# Altium PCB EMG-Arm-ELEC-V2.0.PcbDoc (part 2 of 5)
Units mil, origin at the board's own origin, x right, y up, seen from the top; angles counter-clockwise.
Board outline 8303.83 x 7532.25 mil, 2 copper layers (Top Layer, Bottom Layer), stack 3.556 mil thick; 263 components, 174 nets, 696 pads, 313 vias.
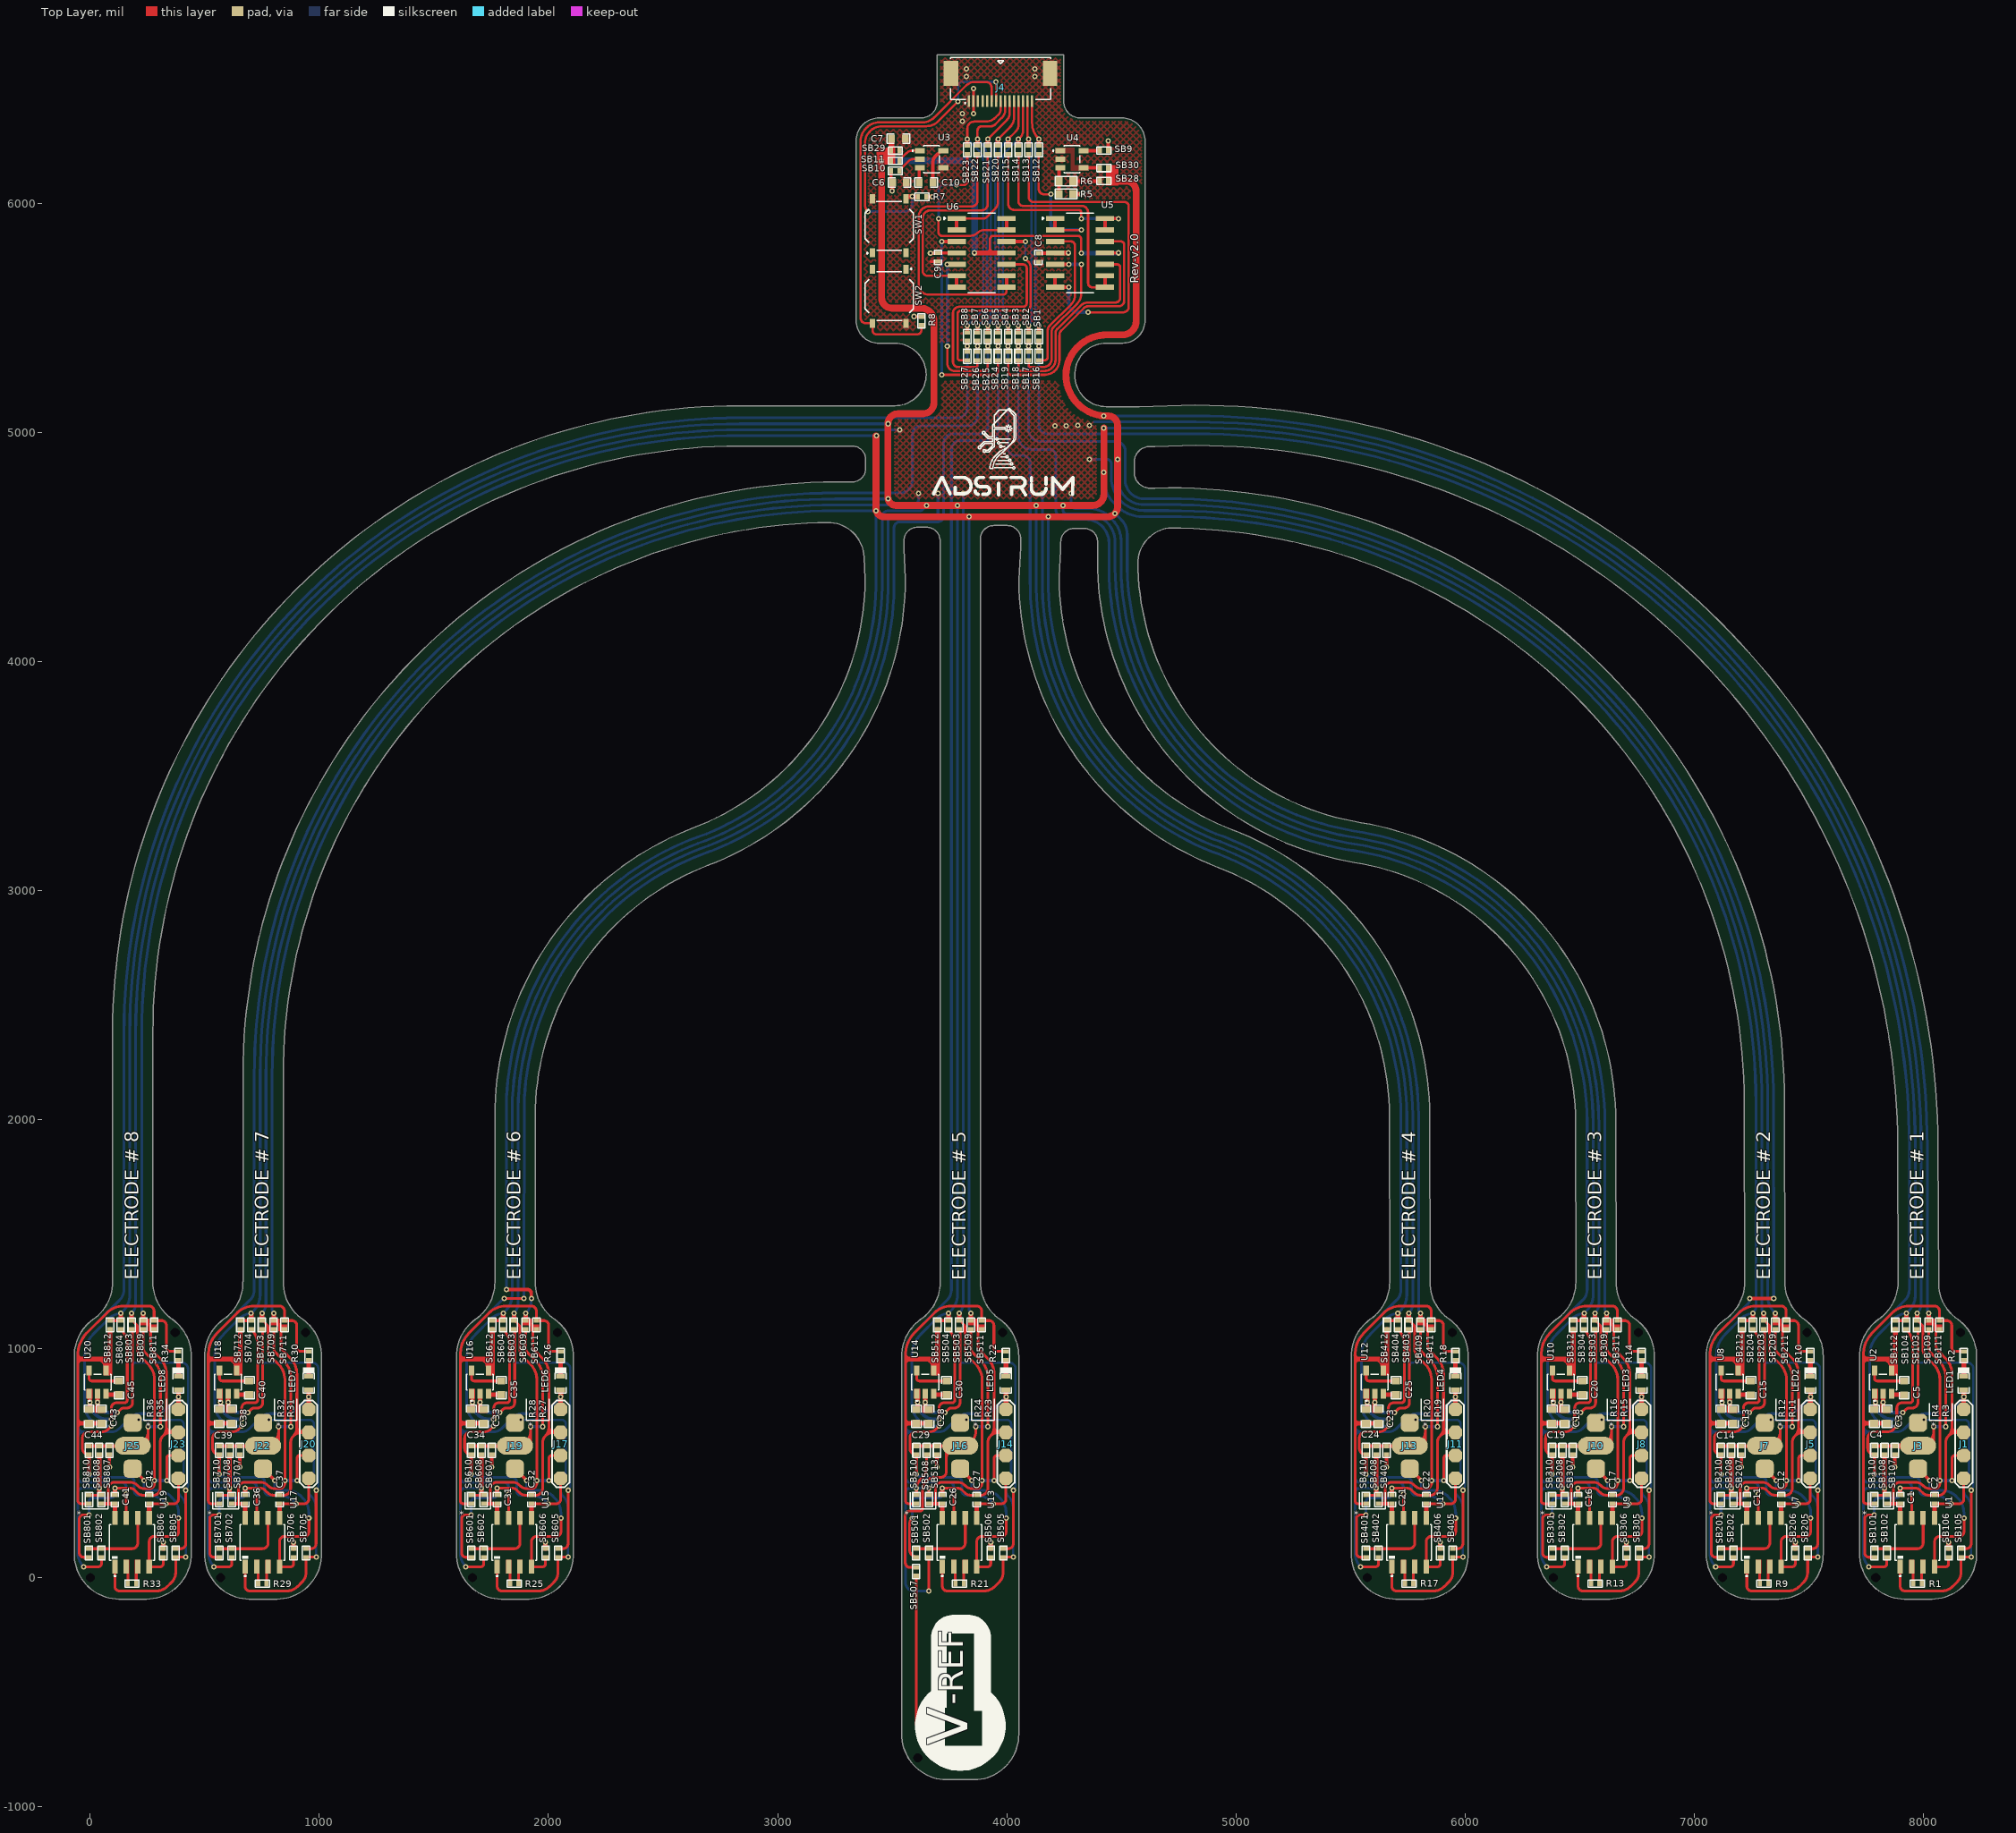
[diagram p0: Top Layer view]

## Part data (continued)
U5 U6: "IC OPAMP GP 1.3MHZ 14SO", Case/Package=SO, Dual Supply Voltage=12V, Input Bias Current=150nA, Input Offset Voltage (Vos)=7mV, Input Voltage Noise Density="40nV/sqrt Hz", LCSC Part Number=C71035, Manufacturer=STMicroelectronics, Max Dual Supply Voltage=15V, Max Operating Temperature=70°C, Max Power Dissipation=400mW, Max Supply Voltage=30V, Min Dual Supply Voltage=1.5V, Min Operating Temperature=0°C, Min Supply Voltage=3V, Nominal Supply Current=1.2mA, Output Current=40mA, Package Quantity=2500, Voltage Gain=100dB, Bandwidth=1.3MHz, Common Mode Rejection Ratio=70dB, ComponentLink1Description=https://datasheet.ciiva.com/4758/cd00000457-103203-4758032.pdf?src-supplier=Mouser, ComponentLink1URL=https://datasheet.ciiva.com/4758/cd00000457-103203-4758032.pdf?src-supplier=Mouser, ComponentLink2Description=https://datasheet.ciiva.com/8008/1834360-8008827.pdf?src-supplier=Element14, ComponentLink2URL=https://datasheet.ciiva.com/8008/1834360-8008827.pdf?src-supplier=Element14, ComponentLink3Description=https://datasheet.ciiva.com/8008/1834360-8008490.pdf?src-supplier=Element14, ComponentLink3URL=https://datasheet.ciiva.com/8008/1834360-8008490.pdf?src-supplier=Element14, ComponentLink4Description=https://datasheet.ciiva.com/28630/1834360-28630538.pdf?src-supplier=Element14, ComponentLink4URL=https://datasheet.ciiva.com/28630/1834360-28630538.pdf?src-supplier=Element14, ComponentLink5Description=https://datasheet.ciiva.com/1795/cd00000457-1795560.pdf?src-supplier=Digi-Key, ComponentLink5URL=https://datasheet.ciiva.com/1795/cd00000457-1795560.pdf?src-supplier=Digi-Key, ComponentLink6Description=https://datasheet.ciiva.com/1795/cd00000457-1795559.pdf?src-supplier=Digi-Key, ComponentLink6URL=https://datasheet.ciiva.com/1795/cd00000457-1795559.pdf?src-supplier=Digi-Key, ComponentLink7Description=https://datasheet.ciiva.com/1795/cd00000457-1795561.pdf?src-supplier=Digi-Key, ComponentLink7URL=https://datasheet.ciiva.com/1795/cd00000457-1795561.pdf?src-supplier=Digi-Key, ComponentLink8Description=https://datasheet.ciiva.com/16375/cd00000457-16375528.pdf?src-supplier=Future+Electronics, ComponentLink8URL=https://datasheet.ciiva.com/16375/cd00000457-16375528.pdf?src-supplier=Future+Electronics, Contact Plating=Tin,Matte, Gain Bandwidth Product=1.3MHz, Height=1.65mm, Item Type=IC, Lead Free="Lead Free", Manufacturer Part Number=LM324DT, Mount="Surface Mount", Number of Amplifiers=4, Number of Channels=4, Number of Circuits=4, Number of Elements=4, Number of Pins=14, Operating Supply Current=1.2mA, Operating Supply Voltage=15V, Output Current per Channel=40mA, Packaging="Cut Tape", Pricing 1="2500=0.18900 (USD)", Radiation Hardening=No, REACH SVHC="No SVHC", RoHS=Yes, RoHS Compliant=Yes, Series=LM324, Slew Rate=0.4V/µs, Stock 1=287500, Supplier 1="Arrow Electronics", Supplier Part Number 1=LM324DT, Supply Type=Single,Dual, Technology=BIPOLAR, Unity Gain Bandwidth Product=1.3MHz, Weight=0.009143oz, Width=4mm

## Free pads (board coordinates)
  round 0 hole 39.37 unplated: MH1(0,0) MH1(568.98,0) MH1(1668.76,0) MH1(3612.24,-788.41) MH1(5574.41,0) MH1(6387.12,-0.01) MH1(7123.87,0) MH1(7793.35,0) MH2(370.49,1069.27) MH2(939.47,1069.27) MH2(2039.25,1069.27) MH2(3982.73,1069.27) MH2(5944.9,1069.27) MH2(6757.61,1069.26) MH2(7494.36,1069.27) MH2(8163.83,1069.27)

## Via types
v1: diameter 23.62, hole 11.81, Top Layer to Bottom Layer, tented both sides, 313 vias

## Nets (pads, with @x,y where several pads share a name; then routed paths per layer and width w, separated by ;. In a path a pad name is that pad's centre, name@x,y a point inside that pad or via, vN(x,y) a via of type N, cw(c..) or ccw(c..) an arc to the next point about the centre after c; other vN are vias at no path point)
#rg1: R1.2 U1.2 | length 76.4
  Top Layer w12: U1.2@7950.38,46.75 7950.38,28.05 7956.88,21.55 R1.2@7956.88,-26.95
#rg2: R9.2 U7.2 | length 76.4
  Top Layer w12: U7.2@7280.91,46.75 7280.91,28.05 7287.41,21.55 R9.2@7287.41,-26.95
#rg3: R13.2 U9.2 | length 76.4
  Top Layer w12: U9.2@6544.16,46.75 6544.16,28.04 6550.66,21.54 R13.2@6550.66,-26.96
#rg4: R17.2 U11.2 | length 76.4
  Top Layer w12: U11.2@5731.44,46.75 5731.45,28.05 5737.95,21.55 R17.2@5737.95,-26.95
#rg5: R21.2 U13.2 | length 76.4
  Top Layer w12: U13.2@3769.28,46.75 3769.28,28.05 3775.78,21.55 R21.2@3775.78,-26.95
#rg6: R25.2 U15.2 | length 76.4
  Top Layer w12: U15.2@1825.8,46.75 1825.8,28.05 1832.3,21.55 R25.2@1832.3,-26.95
#rg7: R29.2 U17.2 | length 76.4
  Top Layer w12: U17.2@726.01,46.75 726.01,28.05 732.51,21.55 R29.2@732.51,-26.95
#rg8: R33.2 U19.2 | length 76.4
  Top Layer w12: U19.2@157.04,46.75 157.04,28.05 163.54,21.55 R33.2@163.54,-26.95
*rg1: R1.1 U1.3 | length 76.4
  Top Layer w12: R1.1@7993.88,-26.95 7993.88,21.55 8000.38,28.05 U1.3@8000.38,46.75
*rg2: R9.1 U7.3 | length 76.4
  Top Layer w12: R9.1@7324.41,-26.95 7324.41,21.55 7330.91,28.05 U7.3@7330.91,46.75
*rg3: R13.1 U9.3 | length 76.4
  Top Layer w12: R13.1@6587.66,-26.96 6587.66,21.54 6594.16,28.04 U9.3@6594.16,46.75
*rg4: R17.1 U11.3 | length 76.4
  Top Layer w12: R17.1@5774.95,-26.95 5774.95,21.55 5781.44,28.05 U11.3@5781.44,46.75
*rg5: R21.1 U13.3 | length 76.4
  Top Layer w12: R21.1@3812.78,-26.95 3812.78,21.55 3819.28,28.05 U13.3@3819.28,46.75
*rg6: R25.1 U15.3 | length 76.4
  Top Layer w12: R25.1@1869.3,-26.95 1869.3,21.55 1875.8,28.05 U15.3@1875.8,46.75
*rg7: R29.1 U17.3 | length 76.4
  Top Layer w12: R29.1@769.51,-26.95 769.51,21.55 776.01,28.05 U17.3@776.01,46.75
*rg8: R33.1 U19.3 | length 76.4
  Top Layer w12: R33.1@200.54,-26.95 200.54,21.55 207.04,28.05 U19.3@207.04,46.75